# Altium PCB Sampler_DIOT.PCBDOC (part 11 of 11)
Units mm, origin at the board's own origin, x right, y up, seen from the top; angles counter-clockwise.
Board outline 222.9 x 100 mm, 4 copper layers (L1, P2, L3, L4), stack 1.6 mm thick; 754 components, 442 nets, 2347 pads, 1230 vias.
Unrouted connection lines stored in the file: 10.
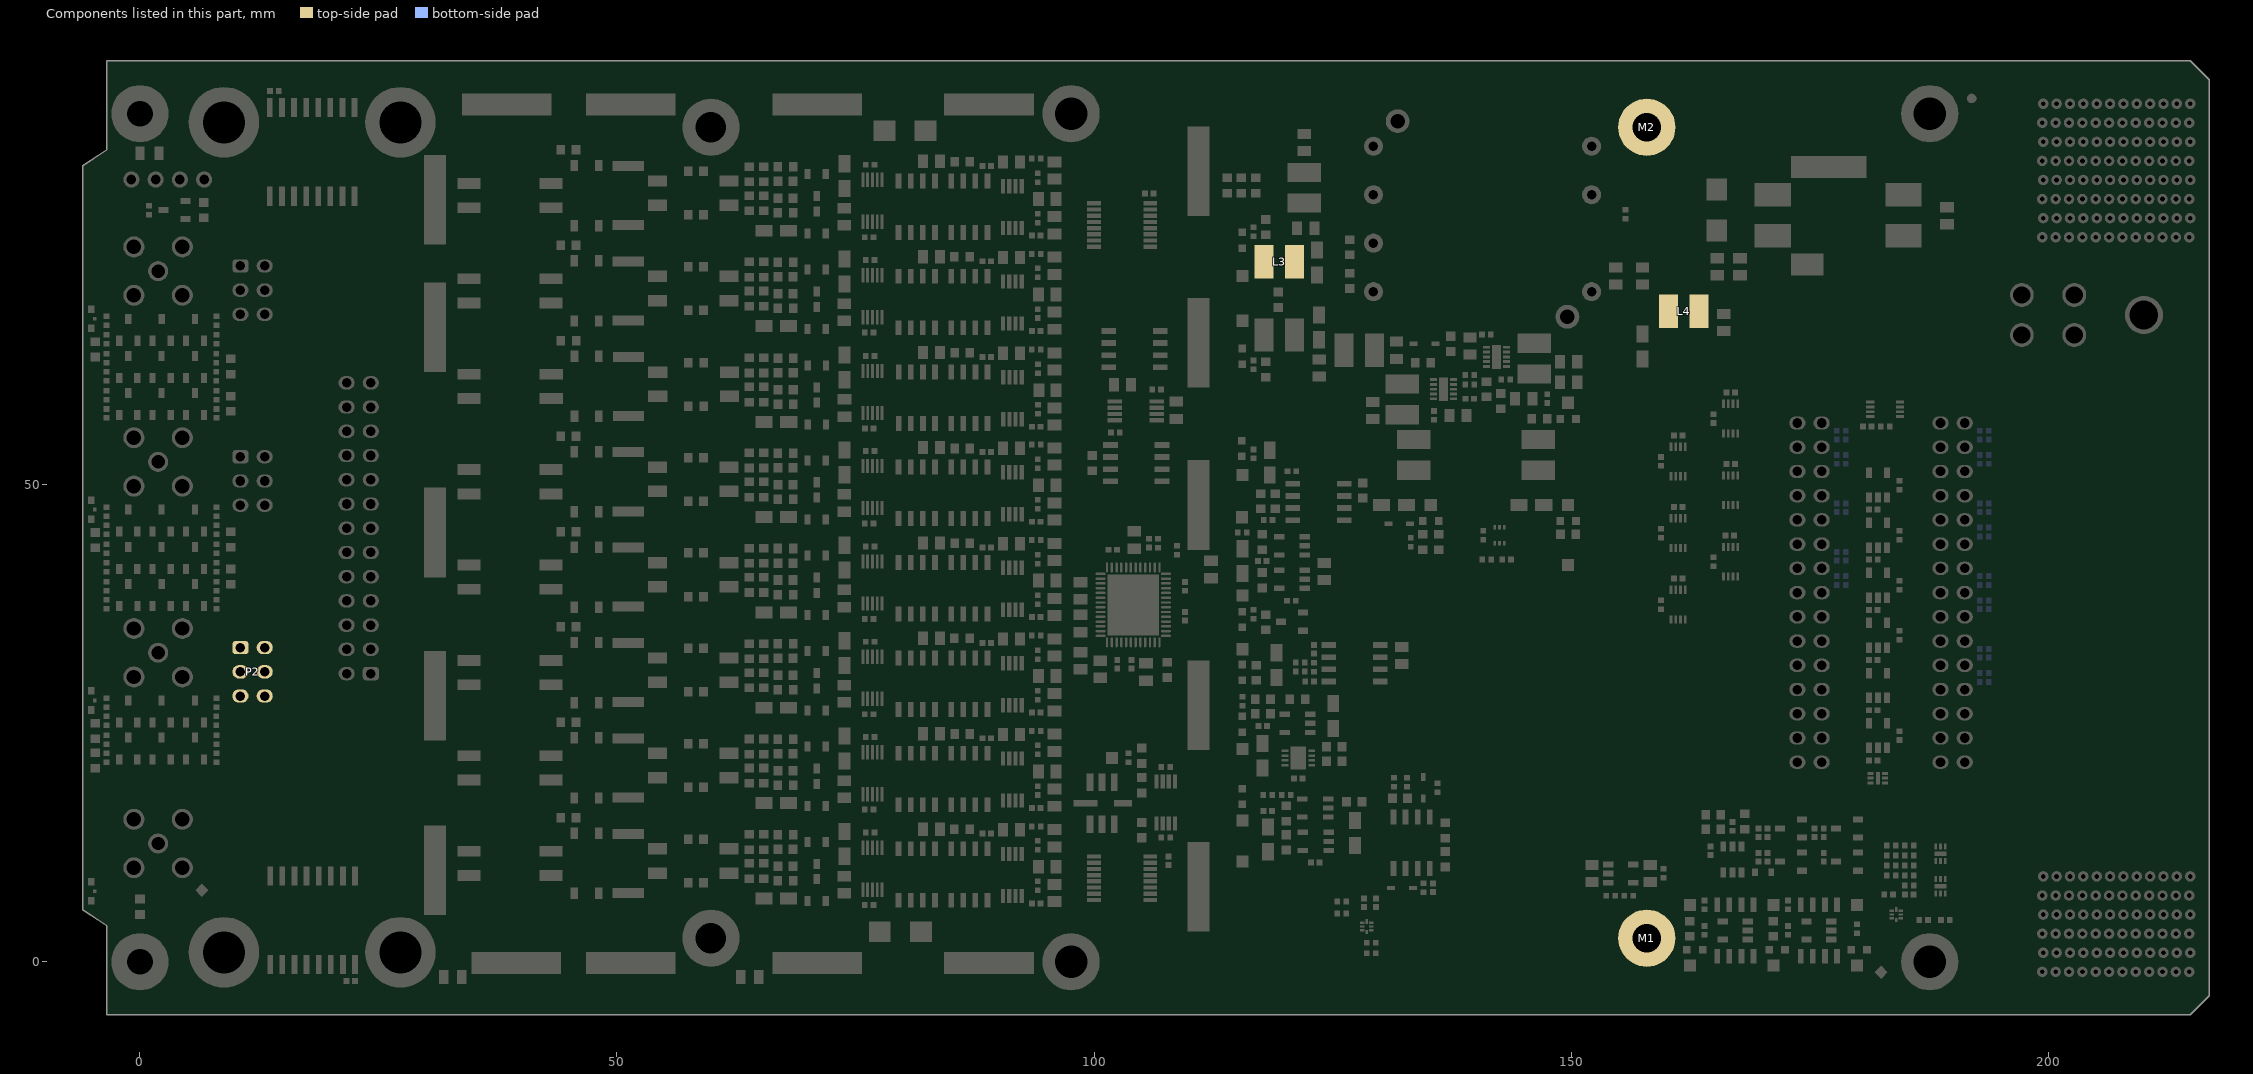
[diagram p12: the components of this part, seen from the top]

## Other copper (continued)
L3:
  rectangle net P5V0A: 108.594,29.955 109.344,31.055
  rectangle net GND: 101.513,34.33 106.594,40.619
  pour cut-out: 146.571,52.532 146.571,53.732 129.524,53.732 120.003,63.253 120.003,94.45 118.803,94.45 118.803,62.703 128.974,52.532
  pour cut-out: 151.332,52.532 162.4,63.6 162.4,94.453 161.2,94.453 161.2,63.65 151.282,53.732 139.55,53.732 139.55,52.532
L4:
  rectangle net N13V0: 120.587,20.17 122.237,22.55
  pour cut-out: 146.571,52.532 146.571,53.732 129.524,53.732 120.003,63.253 120.003,94.45 118.803,94.45 118.803,62.703 128.974,52.532
  pour cut-out: 151.332,52.532 162.4,63.6 162.4,94.453 161.2,94.453 161.2,63.65 151.282,53.732 139.55,53.732 139.55,52.532
  pour cut-out: 116.5,-3.156 96.5,-3.156 96.5,-5.142 116.5,-5.142
  pour cut-out: 36.5,-3.156 41.5,-3.156 41.5,-5.142 36.5,-5.142
P2 (plane layer: these items are gaps in the copper):
  pour cut-out: 151.336,52.521 162.405,63.589 162.405,66.15 161.205,66.15 161.205,63.639 151.286,53.721 129.535,53.721 120.003,63.253 120.003,94.45 118.803,94.45 118.803,62.703 128.985,52.521

## Silkscreen, mask and mechanical layers (free items; w line width, h text height)
TopOverlay:
  drawing of 1245 lines, arcs and shapes, not listed
  text "Termination" at 46.4,85.358 h1.02
  text "off" at 34.132,84.925 h1.02
  text "CH0" at 37.425,84.925 h1.02
  text "on" at 41.457,84.925 h1.02
  text "Termination" at 46.4,75.234 h1.02
  text "off" at 34.132,74.914 h1.02
  text "CH1" at 37.425,74.914 h1.02
  text "on" at 41.457,74.914 h1.02
  text "ADC1" at 5.375,72.1 h1.14
  text "P13V0" at 114.153,71.008 h1.02 r90
  text "Termination" at 46.4,65.186 h1.02
  text "off" at 34.132,64.903 h1.02
  text "CH2" at 37.425,64.903 h1.02
  text "on" at 41.457,64.903 h1.02
  text "N13V0" at 114.153,63.533 h1.02 r90
  text "EEM1" at 170.837,61.919 h1.52
  text "EEM0" at 185.837,61.919 h1.52
  text "Power +12V" at 203.709,60.852 h1.52
  text "P3V3" at 151.125,58.075 h1.02
  text "Termination" at 46.4,55.139 h1.02
  text "off" at 34.132,54.893 h1.02
  text "CH3" at 37.425,54.893 h1.02
  text "on" at 41.457,54.893 h1.02
  text "ADC3" at 5.375,52.3 h1.14
  text "P12V0A" at 114.153,50.125 h1.02 r90
  text "P6V0A" at 136.7,47.4 h1.02
  text "P3V3A" at 151.15,47.4 h1.02
  text "GND" at 114.153,45.225 h1.02 r90
  text "Termination" at 46.4,45.092 h1.02
  text "off" at 34.132,44.882 h1.02
  text "CH4" at 37.425,44.882 h1.02
  text "on" at 41.457,44.882 h1.02
  text "GND" at 151.15,41.12 h1.02
  text "Termination" at 46.4,35.045 h1.02
  text "off" at 34.131,34.872 h1.02
  text "CH5" at 37.425,34.872 h1.02
  text "on" at 41.457,34.872 h1.02
  text "P2V5A" at 114.153,34.725 h1.02 r90
  text "ADC5" at 5.375,32.2 h1.14
  text "P5V0A" at 114.153,28.975 h1.02 r90
  text "Sampler DIOT / v.P_version / WUT ISE .ModifiedDate" at 139.725,25.4 h1.02
  text "Termination" at 46.4,24.997 h1.02
  text "off" at 34.132,24.861 h1.02
  text "CH6" at 37.425,24.861 h1.02
  text "on" at 41.457,24.861 h1.02
  text "REF_P4V096" at 98.125,23.925 h1.02
  text "N12V0A" at 114.153,22.15 h1.02 r90
  text "Termination" at 46.4,14.95 h1.02
  text "off" at 34.125,14.85 h1.02
  text "CH7" at 37.425,14.85 h1.02
  text "on" at 41.457,14.85 h1.02
  text "REF_VCC" at 114.068,13.367 h1.02 r90
  text "ADC7" at 5.375,12.125 h1.14
  text "GND" at 114.153,9.15 h1.02 r90
  text "P3V3_MP2" at 160.286,7.401 h1.02
  text "P3V3_MP" at 169.292,7.401 h1.02
  text "P12V0" at 177.548,7.401 h1.02
  text "Designed by Pawel Kulik" at 35,3.5 h0.6
  text "GND" at 161.028,-2.763 h1.02
  text "GND" at 169.783,-2.763 h1.02
  text "GND" at 178.539,-2.763 h1.02
BottomOverlay:
  drawing of 1242 lines, arcs and shapes, not listed
  text "Sampler DIOT / v.P_version / WUT ISE .ModifiedDate" at 160.105,25.379 h1.02
TopSolder:
  rectangle: 202.9,42.7 216.9,46.203
  rectangle: -3.57,-5.55 216.469,-3.15
BottomSolder:
  rectangle: 202.9,42.7 216.9,46.203
  rectangle: -3.57,-5.55 216.469,-3.15
M1 Board Shape:
  the board outline again, w0.05
M2 Old Board Shape:
  lines w0.1: -5.2,3.65 -5.2,83.395 -3.57,85.025 -3.57,94.349 -3.469,94.45 214.469,94.45 216.469,92.45 216.469,-3.55 214.469,-5.55 -3.57,-5.55 -3.57,1.65 -3.57,3.65 -5.2,3.65
M4 Shielding:
  lines w1: 30.944,-0.12 30.944,89.88 110.944,89.88 110.944,-0.12 30.944,-0.12 ; 115.944,53.88 115.944,88.88 155.944,88.88 155.944,53.88 115.944,53.88
Mechanical 6:
  drawing of 295 lines, arcs and shapes, not listed
  text "Layer" at 46.911,143.673 h1.52
  text "Name" at 57.323,143.673 h1.52
  text "Material" at 79.415,143.673 h1.52
  text "Thickness" at 101.253,143.673 h1.52
  text "Constant" at 117.759,143.673 h1.52
  text "Board Layer Stack" at 132.233,143.673 h1.52
  text "TopOverlay" at 57.323,140.625 h1.52
  text "TopSolder" at 57.323,137.577 h1.52
  text "Solder Resist" at 79.415,137.577 h1.52
  text "0.010mm" at 101.253,137.577 h1.52
  text "3.5" at 117.759,137.577 h1.52
  text "1" at 46.911,134.529 h1.52
  text "L1" at 57.323,134.529 h1.52
  text "0.045mm" at 101.253,134.529 h1.52
  text "Dielectric1" at 57.323,131.481 h1.52
  text "FR-4" at 79.415,131.481 h1.52
  text "0.120mm" at 101.253,131.481 h1.52
  text "4.2" at 117.759,131.481 h1.52
  text "2" at 46.911,128.433 h1.52
  text "P2" at 57.323,128.433 h1.52
  text "0.035mm" at 101.253,128.433 h1.52
  text "Dielectric 3" at 57.323,125.385 h1.52
  text "1.200mm" at 101.253,125.385 h1.52
  text "4.2" at 117.759,125.385 h1.52
  text "3" at 46.911,122.337 h1.52
  text "L3" at 57.323,122.337 h1.52
  text "0.035mm" at 101.253,122.337 h1.52
  text "Dielectric2" at 57.323,119.289 h1.52
  text "FR-4" at 79.415,119.289 h1.52
  text "0.120mm" at 101.253,119.289 h1.52
  text "4.2" at 117.759,119.289 h1.52
  text "4" at 46.911,116.241 h1.52
  text "L4" at 57.323,116.241 h1.52
  text "0.045mm" at 101.253,116.241 h1.52
  text "BottomSolder" at 57.323,113.193 h1.52
  text "Solder Resist" at 79.415,113.193 h1.52
  text "0.010mm" at 101.253,113.193 h1.52
  text "3.5" at 117.759,113.193 h1.52
  text "BottomOverlay" at 57.323,110.145 h1.52
Top Courtyard:
  lines w0.1: 169.152,17.126 169.152,60.386 179.392,60.386 179.392,17.126 169.152,17.126 ; 187.922,17.1 198.162,17.1 198.162,60.36 187.922,60.36 187.922,17.1
DrillDrawing:
  rectangle: 111.544,60.38 113.444,61.055

## Text inside footprints (layer, text, board x,y; h text height)
SW1A: TopOverlay "1" at 32.926,82.819 h1; Top Assembly "1" at 32.927,82.824 h1
SW1B: TopOverlay "1" at 32.926,72.819 h1; Top Assembly "1" at 32.927,72.824 h1
SW1C: TopOverlay "1" at 32.939,62.819 h1; Top Assembly "1" at 32.94,62.824 h1
SW1D: TopOverlay "1" at 32.926,52.819 h1; Top Assembly "1" at 32.927,52.824 h1
SW1E: TopOverlay "1" at 32.926,42.819 h1; Top Assembly "1" at 32.927,42.824 h1
SW1F: TopOverlay "1" at 32.926,32.819 h1; Top Assembly "1" at 32.927,32.824 h1
SW1G: TopOverlay "1" at 32.926,22.819 h1; Top Assembly "1" at 32.927,22.824 h1
SW1H: TopOverlay "1" at 32.926,12.819 h1; Top Assembly "1" at 32.927,12.824 h1
T_J1: TopOverlay "30" at 192.578,24.869 h1.02 r270; Top Assembly "30" at 192.667,21.555 h1.02 r270
T_J2: TopOverlay "30" at 177.578,24.869 h1.02 r270; Top Assembly "30" at 177.667,21.555 h1.02 r270
T_J4: DrillDrawing "Diam. 0.5mm +/-0.05" at 215.55,12.95 h1 r180; DrillDrawing "PRESS-FIT TECHNOLOGY" at 215.55,11.45 h1 r180; TopOverlay "6" at 194.85,8.6 h1 r90; TopOverlay "5" at 194.85,6.6 h1 r90; TopOverlay "4" at 194.85,4.6 h1 r90; TopOverlay "3" at 194.85,2.6 h1 r90; TopOverlay "2" at 194.85,0.6 h1 r90; TopOverlay "1" at 194.85,-1.4 h1 r90; Top Assembly "6" at 194.85,8.6 h1 r90; Top Assembly "5" at 194.85,6.6 h1 r90; Top Assembly "4" at 194.85,4.6 h1 r90; Top Assembly "3" at 194.85,2.6 h1 r90; Top Assembly "2" at 194.85,0.6 h1 r90; Top Assembly "1" at 194.85,-1.4 h1 r90; Top Assembly "L" at 199.9,-3.25 h1 r90; Top Assembly "K" at 201.3,-3.25 h1 r90; Top Assembly "J" at 202.7,-3.25 h1 r90; Top Assembly "I" at 204.1,-3 h1 r90; Top Assembly "H" at 205.5,-3.25 h1 r90; Top Assembly "G" at 206.9,-3.25 h1 r90; Top Assembly "F" at 208.3,-3.25 h1 r90; Top Assembly "E" at 209.7,-3.25 h1 r90; Top Assembly "D" at 211.1,-3.25 h1 r90; Top Assembly "C" at 212.5,-4.25 h1 r90; Top Assembly "B" at 213.9,-4.25 h1 r90; Top Assembly "A" at 215.3,-4.25 h1 r90; M8 "Edge of Daugher Card" at 217.65,0.725 h0.5 r90; M8 "Top Surface of Mother Board" at 229.15,-0.425 h0.5 r90
T_J5: DrillDrawing "Diam. 0.5mm +/-0.05" at 215.55,93.95 h1 r180; DrillDrawing "PRESS-FIT TECHNOLOGY" at 215.55,92.45 h1 r180; TopOverlay "7" at 194.85,87.6 h1 r90; TopOverlay "8" at 194.85,89.6 h1 r90; TopOverlay "6" at 194.85,85.6 h1 r90; TopOverlay "5" at 194.85,83.6 h1 r90; TopOverlay "4" at 194.85,81.6 h1 r90; TopOverlay "3" at 194.85,79.6 h1 r90; TopOverlay "2" at 194.85,77.6 h1 r90; TopOverlay "1" at 194.85,75.6 h1 r90; TopOverlay "L" at 199.9,92.35 h1 r90; TopOverlay "K" at 201.3,92.35 h1 r90; TopOverlay "J" at 202.7,92.35 h1 r90; TopOverlay "I" at 204.1,92.35 h1 r90; TopOverlay "H" at 205.5,92.35 h1 r90; TopOverlay "G" at 206.9,92.35 h1 r90; TopOverlay "F" at 208.3,92.35 h1 r90; TopOverlay "E" at 209.7,92.35 h1 r90; TopOverlay "D" at 211.1,92.35 h1 r90; TopOverlay "C" at 212.5,92.35 h1 r90; TopOverlay "B" at 213.9,92.35 h1 r90; TopOverlay "A" at 215.3,92.35 h1 r90; Top Assembly "7" at 194.85,87.6 h1 r90; Top Assembly "8" at 194.85,89.6 h1 r90; Top Assembly "6" at 194.85,85.6 h1 r90; Top Assembly "5" at 194.85,83.6 h1 r90; Top Assembly "4" at 194.85,81.6 h1 r90; Top Assembly "3" at 194.85,79.6 h1 r90; Top Assembly "2" at 194.85,77.6 h1 r90; Top Assembly "1" at 194.85,75.6 h1 r90; Top Assembly "L" at 199.9,73.75 h1 r90; Top Assembly "K" at 201.3,73.75 h1 r90; Top Assembly "J" at 202.7,73.75 h1 r90; Top Assembly "I" at 204.1,74 h1 r90; Top Assembly "H" at 205.5,73.75 h1 r90; Top Assembly "G" at 206.9,73.75 h1 r90; Top Assembly "F" at 208.3,73.75 h1 r90; Top Assembly "E" at 209.7,73.75 h1 r90; Top Assembly "D" at 211.1,73.75 h1 r90; Top Assembly "C" at 212.5,72.75 h1 r90; Top Assembly "B" at 213.9,72.75 h1 r90; Top Assembly "A" at 215.3,72.75 h1 r90; M8 "Edge of Daugher Card" at 217.65,79.725 h0.5 r90; M8 "Top Surface of Mother Board" at 229.15,78.575 h0.5 r90
T_J6: TopOverlay "1" at 201.8,72.275 h1.2 r270; Top Assembly "1" at 201.8,72.275 h1.2 r270